# Altium PCB Crystal_holder.PcbDoc
Units mm, origin at the board's own origin, x right, y up, seen from the top; angles counter-clockwise.
Board outline 16 x 16 mm, 2 copper layers (Top Layer, Bottom Layer), stack 0.78 mm thick; 7 components, 2 nets, 8 pads, 1 vias.
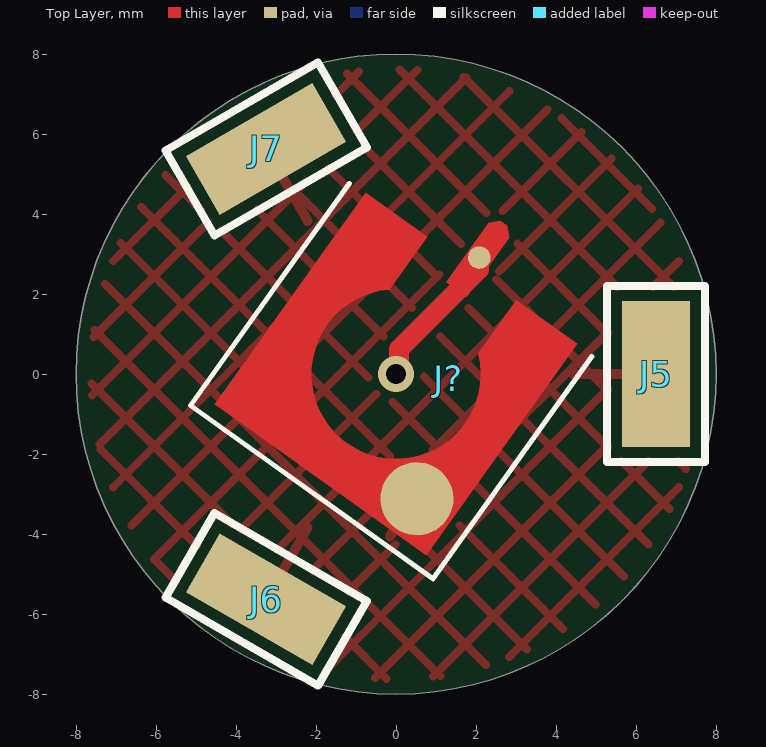
[diagram p0: Top Layer view]
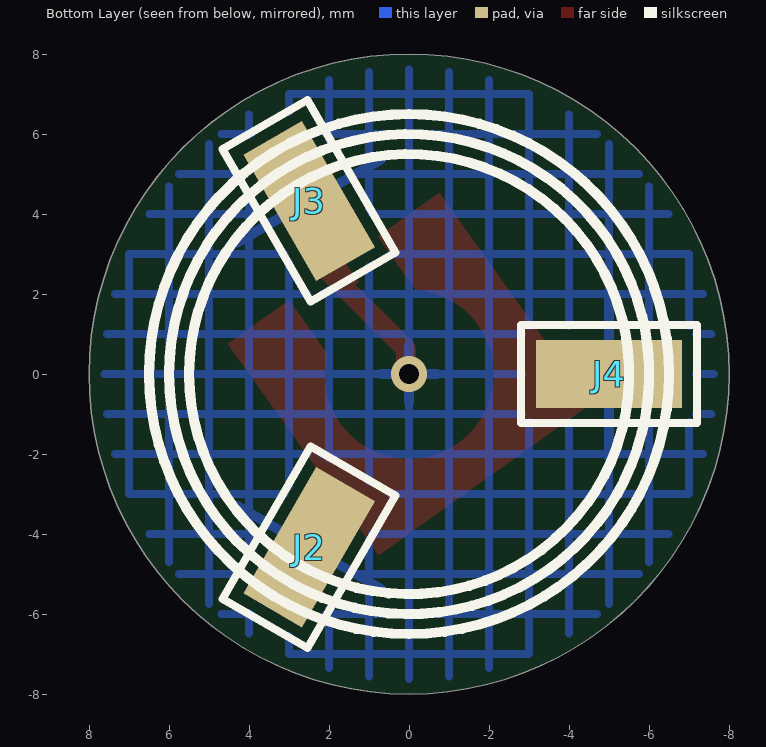
[diagram p1: Bottom Layer view, seen from below]

## Layer stack, top to bottom
Top Solder: solder mask 0.01, Solder Resist, Dk 3.5
Top Layer: signal copper 0.035
Dielectric2: core 0.71, FR-4, Dk 4.3
Bottom Layer: signal copper 0.035
Bottom Solder: solder mask 0.01, Solder Resist, Dk 3.5

## Board outline
0,-8 cw(c0,0) -8,0 cw(c0,0) 0,8 cw(c0,0) 8,0 cw(c0,0)

## Design rules (kind name [scope] priority, off if disabled: settings)
AssemblyTestPointUsage [All] p1 off:
AssemblyTestpoint [All] p1 off: testpointundercomponent=TRUE minsize=1.016 maxsize=2.54 preferedsize=1.524 minholesize=0 maxholesize=1.016 preferedholesize=0.813 testpointgrid=0.025 usegrid=TRUE gridtolerance=0 allowsidetop=TRUE allowsidebottom=TRUE
BoardOutlineClearance [All] p1: gap=0.25 ignorepadtopadclearanceinfootprint=FALSE except(0: Arc-SplitContinuation Track-SplitContinuation SMDPad-SplitContinuation THPad-SplitContinuation Via-SplitContinuation Fill-SplitContinuation Poly-SplitContinuation Region-SplitContinuation Text-SplitContinuation)
Clearance Clearance-xPP-xTP-xTT [All] p1: gap=0.15 ignorepadtopadclearanceinfootprint=FALSE except(0.01: Fill-Hole Poly-Hole Region-Hole Text-Hole; 0.2: Arc-Hole Track-Hole SMDPad-Hole THPad-Hole Via-Hole; 0.25: Arc-Arc Arc-Track Track-Track)
ComponentClearance [All] p1: gap=0.25 collisioncheckmode=3 verticalgap=0.25 showdistances=FALSE
DiffPairsRouting [All] p1: maxlimit=0.25 minlimit=0.25 mostfreqgap=0.25 toplayer_minwidth=0.381 toplayer_maxwidth=0.381 toplayer_prefwidth=0.381 bottomlayer_minwidth=0.381 bottomlayer_maxwidth=0.381 bottomlayer_prefwidth=0.381 maxuncoupledlength=12.5
FabricationTestPointUsage [All] p1 off: valid=0 allowmultiple=FALSE
FabricationTestpoint [All] p1 off: side=3 testpointundercomponent=TRUE minsize=1.016 maxsize=2.54 preferedsize=1.524 minholesize=0 maxholesize=1.016 preferedholesize=0.813 testpointgrid=0.025 allowsidetop=TRUE allowsidebottom=TRUE usegrid=TRUE gridtolerance=0
Height [All] p1: minheight=0 maxheight=25 prefheight=12.5
HoleSize HoleSize-PTH [All] p1: absolutevalues=TRUE maxlimit=7 minlimit=0.25 maxpercent=80.000 minpercent=20.000
HoleToHoleClearance [All] p1: gap=0.35 allowstackedmicrovias=TRUE
MinimumAnnularRing "Minimum IAR  >0.34mm" [((ObjectKind = 'Pad') OR (ObjectKind = 'Via')) And (Layer = 'MultiLayer') And (HoleDiameter > AsMM(0.34))] p1: minimumring=0.125 // minimum inner annular ring for pads > 0.45mm finished hole size
MinimumAnnularRing "Minimum IAR <=0.34mm" [((ObjectKind = 'Pad') OR (ObjectKind = 'Via')) And (Layer = 'MultiLayer') And (HoleDiameter <= AsMM(0.34))] p2: minimumring=0.175 // minimum inner annular ring for pads <= 0.45mm finished hole size
MinimumSolderMaskSliver [All] p1: minsoldermaskwidth=0.08
PlaneClearance PlaneClearance-IPI [All] p1: clearance=0.25
PlaneConnect [All] p1: planeconnectstyle=Relief reliefexpansion=0.25 reliefentries=4 reliefconductorwidth=0.25 reliefairgap=0.25
PolygonConnect PolygonConnect-xTW [All] p1: thpad.connectstyle=Relief thpad.reliefconductorwidth=0.25 thpad.reliefentries=4 thpad.polygonreliefangle="90 Angle" thpad.airgapwidth=0.25 smdpad.connectstyle=Relief smdpad.reliefconductorwidth=0.25 smdpad.reliefentries=2 smdpad.polygonreliefangle="0 Angle" smdpad.airgapwidth=0.25 via.connectstyle=Relief via.reliefconductorwidth=0.25 via.reliefentries=4 via.polygonreliefangle="90 Angle" via.airgapwidth=0.25
RoutingCorners [All] p1: cornerstyle=45-Degree minsetback=2.5 maxsetback=2.5
RoutingVias "Routing VIAs" [All] p1: holewidth=0.5 width=0.85 viastyle="Through Hole" minholewidth=0.5 minwidth=0.85 maxholewidth=0.9 maxwidth=1.25 useviatemplates=TRUE viatemplateguid#1={331BAD09-FCF4-48D2-A875-4A33C9B82B72} viatemplateguid#2={6A946846-BB7C-48EE-9F70-67F61FD11D76} viatemplatename#1=via_r65h25_mm viatemplatename#2=via_r90h50_mm // Standard VIAs
SMDNeckDown [All] p1: percent=90.000
SilkToSilkClearance [All] p1: silktosilkclearance=0.05
SilkToSolderMaskClearance SilkscreenOverComponentPads [IsPad] p1: minsilkscreentomaskgap=0.1 clearancetoexposedcopper=TRUE
SolderMaskExpansion [All] p1: expansion=0 istentingtop=FALSE
SupplyNets "Schematic Supply Nets" [InNet('GND')] p1: voltage=0.000
UnRoutedNet [All] p1: checkbadconnections=TRUE
Width Width-xTW [All] p1: maxlimit=10 minlimit=0.15 preferedwidth=0.25
14 further rules are at their usual default settings.

## Components (designator, comment, footprint, x,y, rotation, side; value= is the part's Value field where it differs from the comment)
J2 "3-2199250-4" FP-3-2199250-4-MFG 2.5,-4.33 r300 bottom
J3 "3-2199250-4" FP-3-2199250-4-MFG 2.5,4.33 r60 bottom
J4 "3-2199250-4" FP-3-2199250-4-MFG -5,0 r180 bottom
J5 "3-2199250-4" FP-3-2199250-4-MFG 6.5,0 r270 top
J6 "3-2199250-4" FP-3-2199250-4-MFG -3.25,-5.629 r150 top
J7 "3-2199250-4" FP-3-2199250-4-MFG -3.25,5.629 r30 top
J? "SMP-MSCM-PCS-12" SMP-MSCM-PCS-12_MFG 0,0 r144.46 top

## Footprints (in the part's own frame and the unit in brackets; to place one, negate y for a bottom-side part, rotate by r counter-clockwise, add the part's x,y. Pads: shape width x height; smd on the part's side, far side on the other; paste and mask are expansions set on the pad)
FP-3-2199250-4-MFG [mm]
  rect 3.65x1.7 smd paste+0 mask+0: 1(0,0)
  silkscreen extent -2.2,-1.23 2.2,1.23, body extent -1.73,-0.75 1.73,0.75, height 3.7
SMP-MSCM-PCS-12_MFG [mm] "Recommended Land Pattern"
  round 0.567 smd paste+0 mask+0: 1(0,-3.581)
  round 1.828 smd paste+0 mask+0: 2(-2.234,2.234)
  Top Layer region: -0.315,-2.6 0.315,-2.6 0.315,-4.42 0.105,-4.63 -0.105,-4.63 -0.315,-4.42
  Top Layer region: -3.25,3.25 3.25,3.25 3.25,-3.25 1.365,-3.25 1.365,-1.622 1.967,-0.792 2.108,0.223 1.757,1.187 0.995,1.872 0,2.12 -0.995,1.872 -1.757,1.187 -2.108,0.223 -1.967,-0.792 -1.365,-1.622 -1.365,-1.622 -1.365,-3.25 -3.25,-3.25
  silkscreen extent -3.73,-3.2 3.72,3.63, body extent -3,-3.54 3,3, height 4.2

## Part data
J2 J3 J4 J5 J6 J7: library part CMP-03364-000003-1, "3.6H SPRNG FINGER TYPE C SMT", Current Rating=2A, Contact Plating=Gold, ELV=Compliant, Lead Free="Lead Free", Packaging="Tape and Reel", Plating Thickness=0.5um, Preloaded=No, RoHS Compliant=Yes, Width=1.5mm
J?: library part CMP-09325-111578890-1, "RF / Coaxial Connector, SMP Coaxial, Straight Jack, Surface Mount Vertical, 50 ohm, Brass", Dielectric Material="Liquid Crystal Polymer", Frequency=20GHz, Max Operating Temperature=165°C, Min Operating Temperature=-40°C, ComponentLink2Description="Datasheet URL", ComponentLink2URL=https://www.amphenolrf.com/library/download/link/link_id/591925/parent/SMP-MSCM-PCS-12/, Contact Gender=Male, HelpURL=https://www.amphenolrf.com/library/download/link/link_id/591925/parent/SMP-MSCM-PCS-12/, Impedance=50Ω, Lifecycle Status=Production, Number of Pins=1, RoHS=Compliant, Shell Material=Brass

## Via types
v1: diameter 0.9, hole 0.5, Top Layer to Bottom Layer, 1 vias

## Nets (pads, with @x,y where several pads share a name; then routed paths per layer and width w, separated by ;. In a path a pad name is that pad's centre, name@x,y a point inside that pad or via, vN(x,y) a via of type N, cw(c..) or ccw(c..) an arc to the next point about the centre after c; other vN are vias at no path point)
GND: J5.1 J6.1 J7.1 J?.2
NetJ2_1: J2.1 J3.1 J4.1 J?.1 | length 3.8
  Top Layer w0.5: v1(0,0) 0.074,0.074 0.074,0.623 2.069,2.618 2.069,2.901 J?.1

## Polygon pours and split planes (outlines as drawn)
GND on Top Layer "GND_L01_P000" (hatched 45Degree grid 1 track 0.203, remove dead copper, pour order 0): -10.725,8.999 10.725,8.999 10.725,-8.999 -10.725,-8.999
NetJ2_1 on Bottom Layer "NETJ2_1_L02_P001" (hatched 90Degree grid 1 track 0.203, remove dead copper, pour order 1): -10.725,8.999 10.725,8.999 10.725,-8.999 -10.725,-8.999

## Silkscreen, mask and mechanical layers (free items; w line width, h text height)
Bottom Overlay:
  circle w0.254: c0,0 r5.5
  circle w0.254: c0,0 r6.5
  circle w0.254: c0,0 r6
Mechanical 1:
  circle w0.254: c0,0 r8